# Altium PCB PCB1.PcbDoc (part 1 of 2)
Units mm, origin at the board's own origin, x right, y up, seen from the top; angles counter-clockwise.
Board outline 154.31 x 109.98 mm, 2 copper layers (Top Layer, Bottom Layer); 153 components, 126 nets, 468 pads, 76 vias.
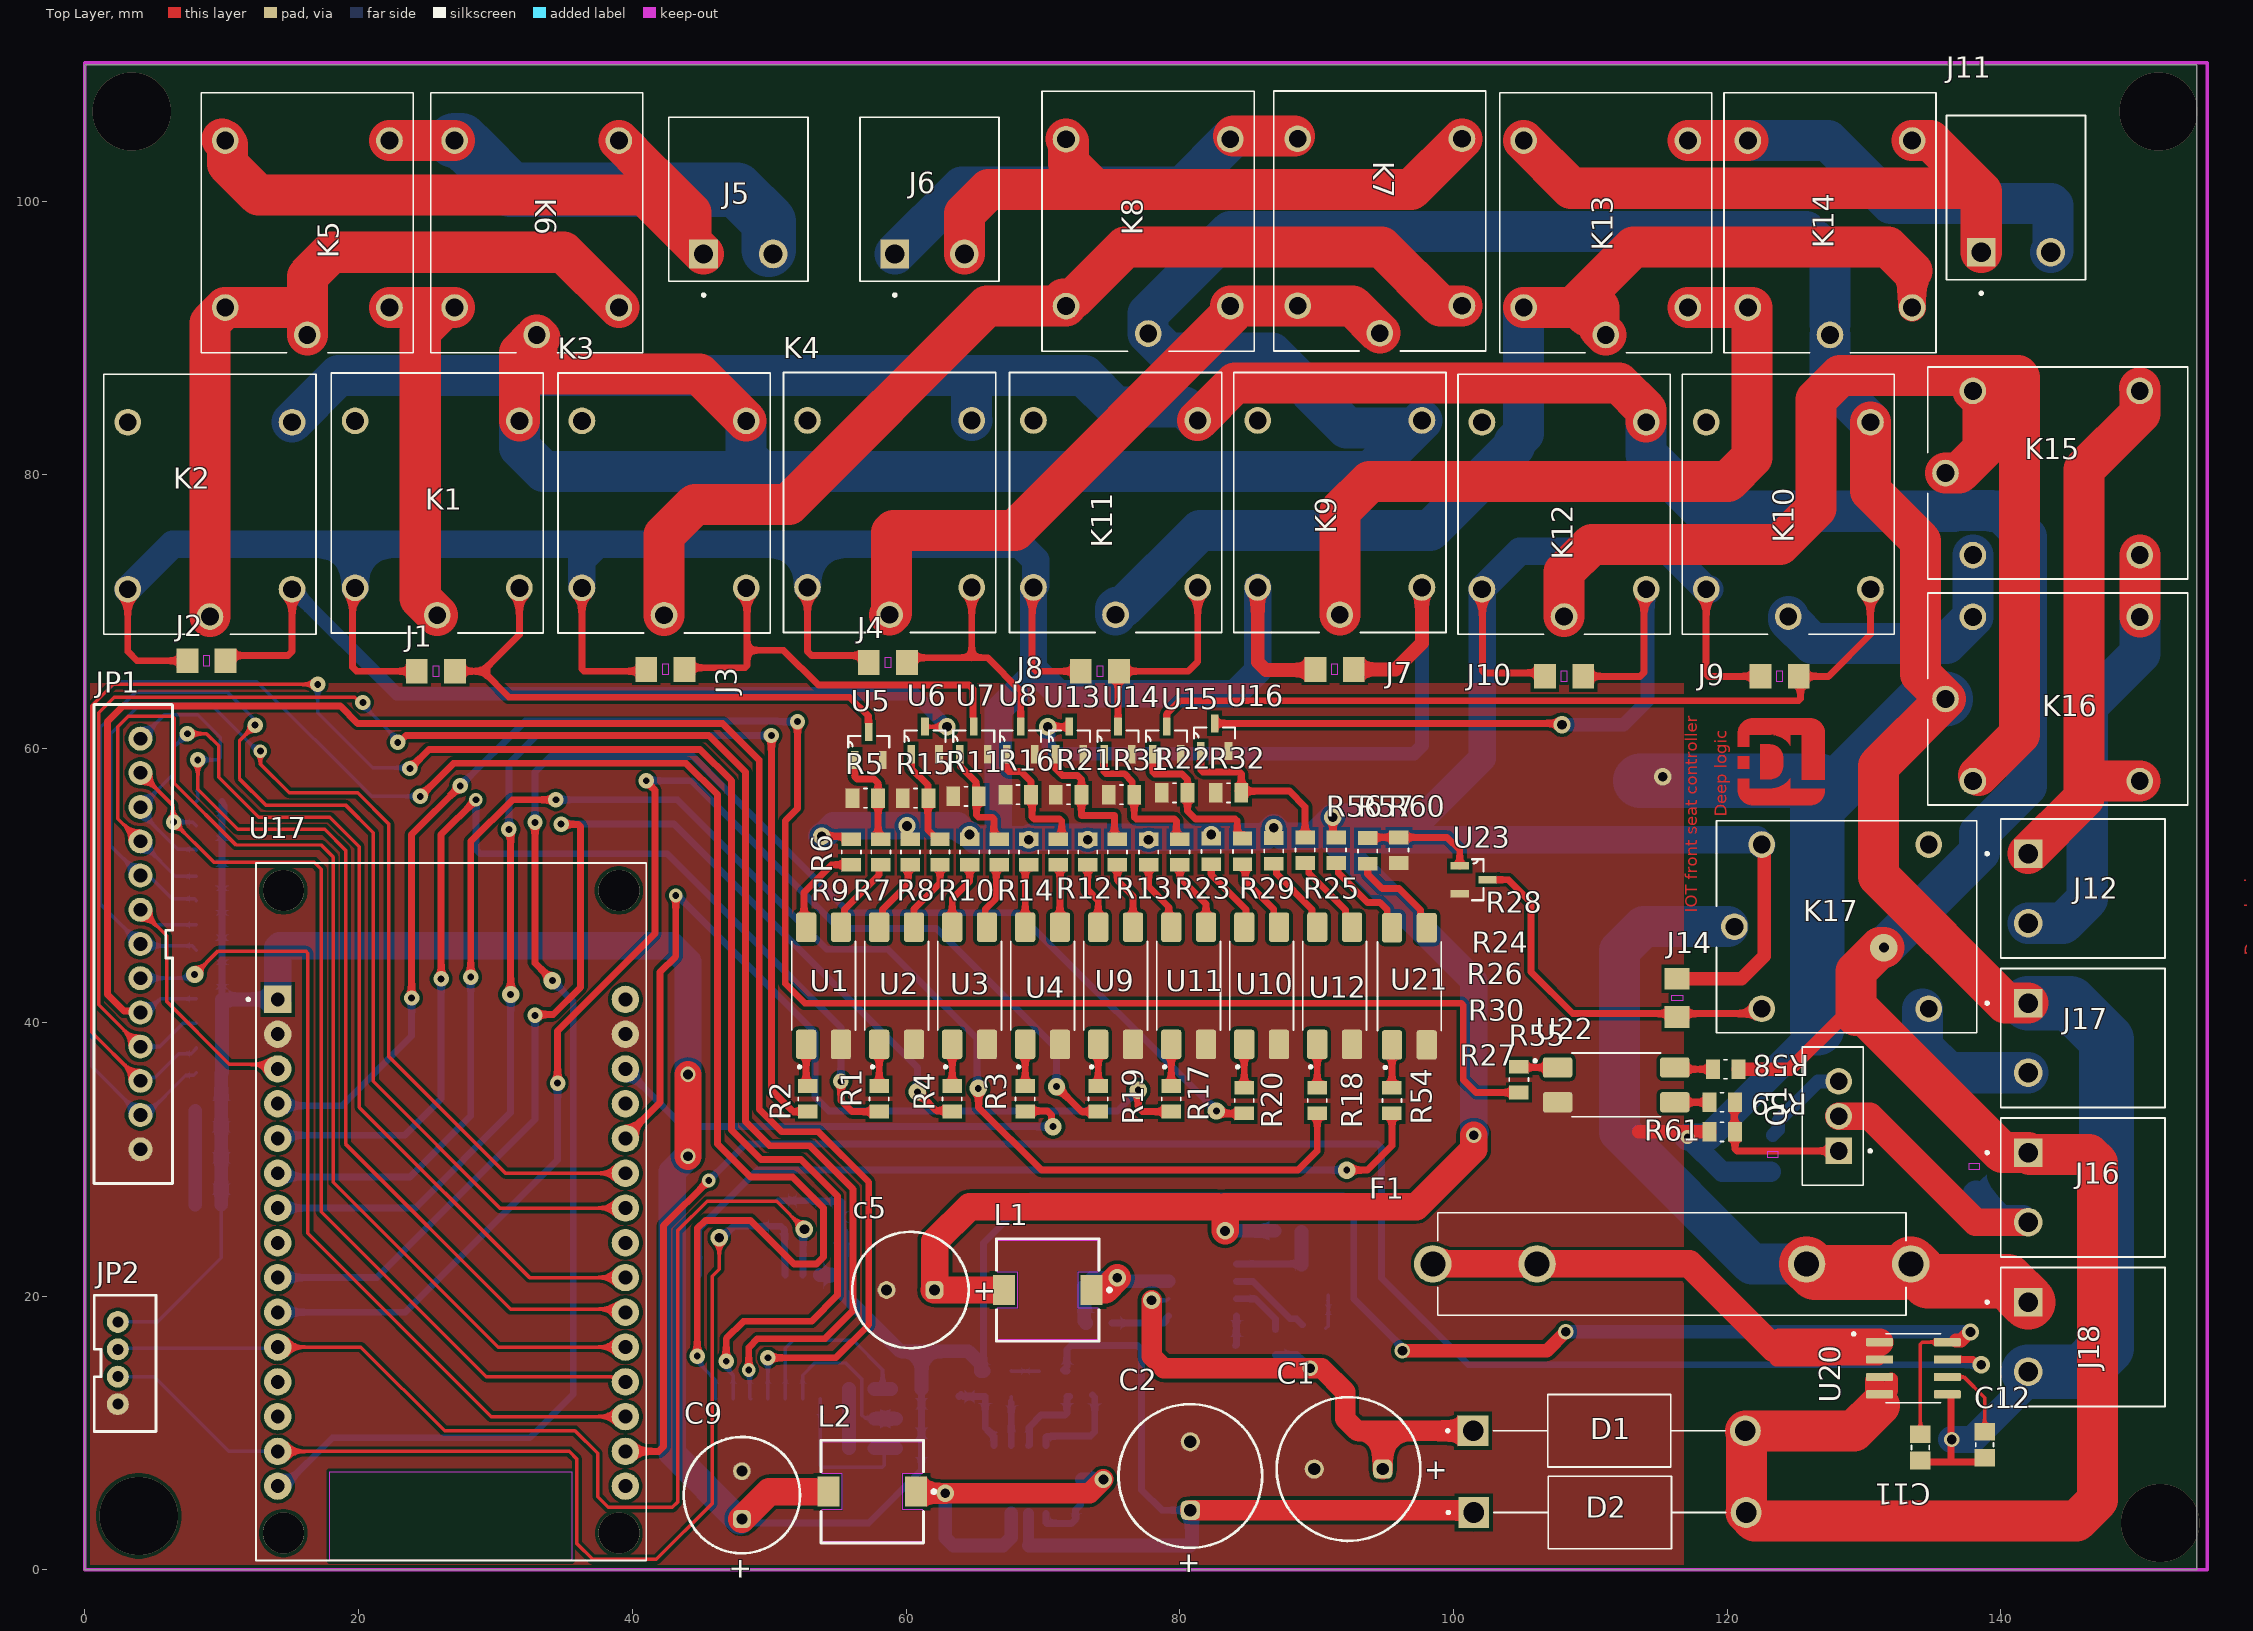
[diagram p0: Top Layer view]
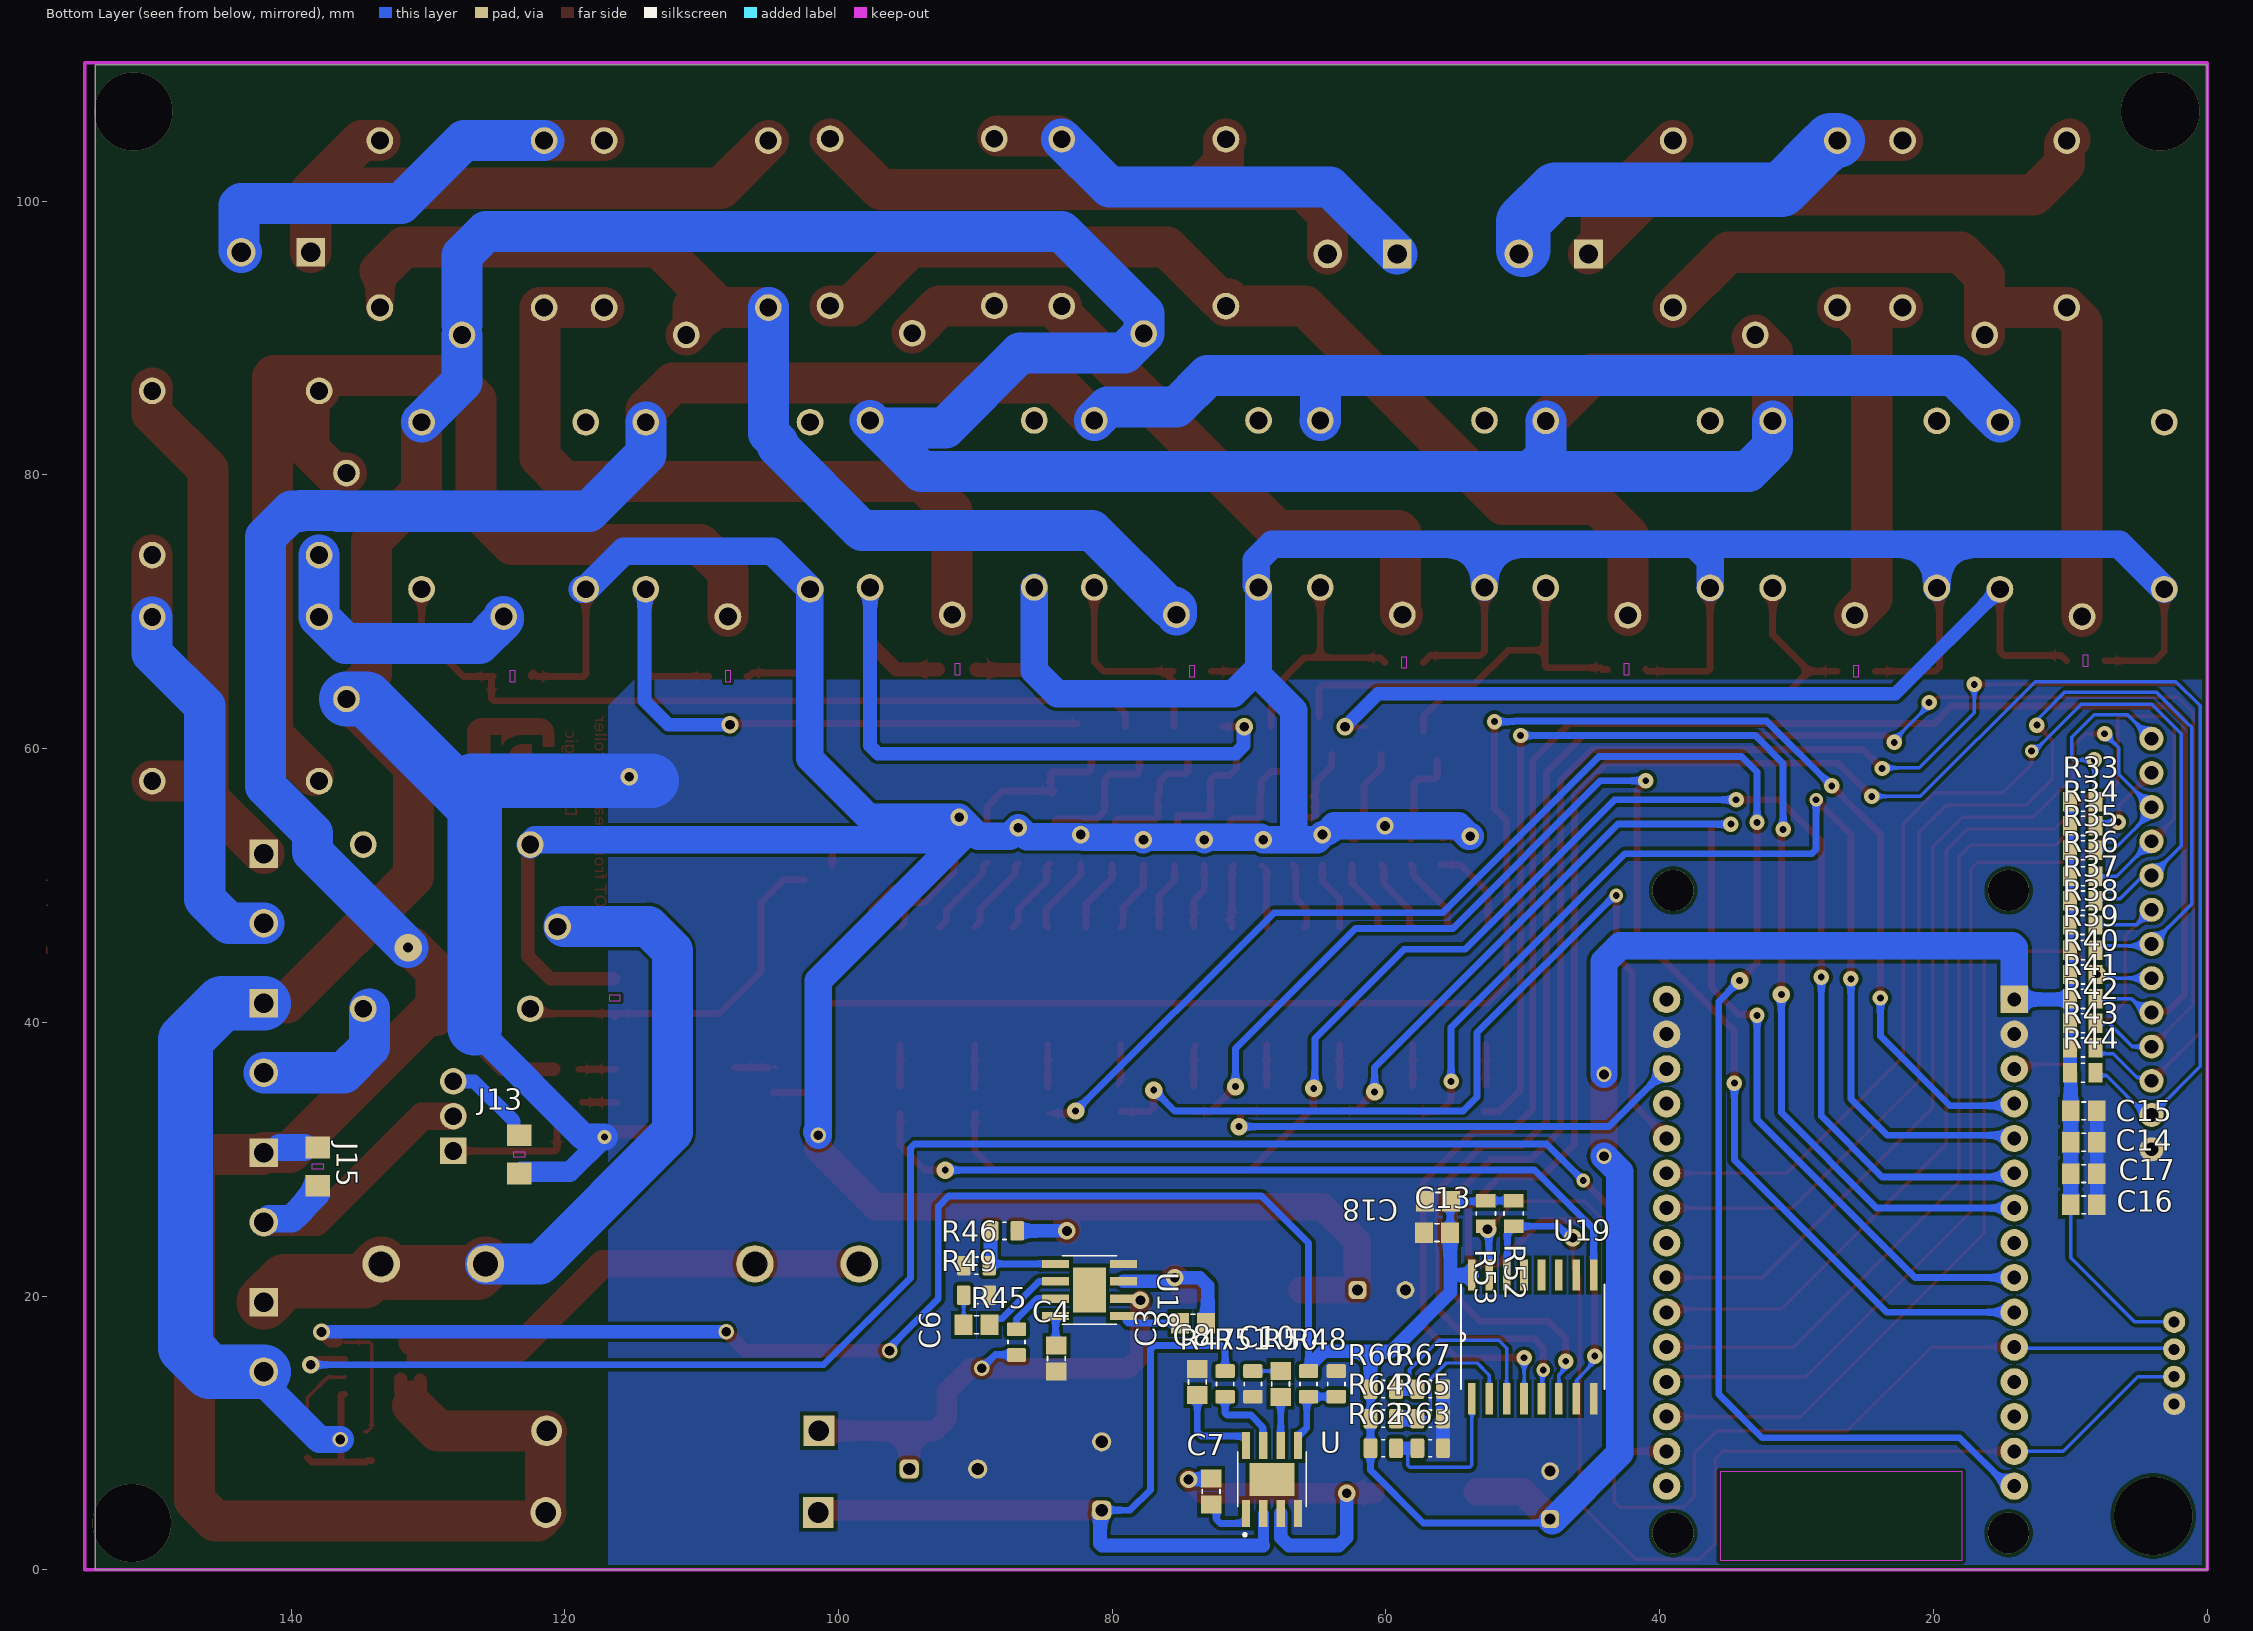
[diagram p1: Bottom Layer view, seen from below]
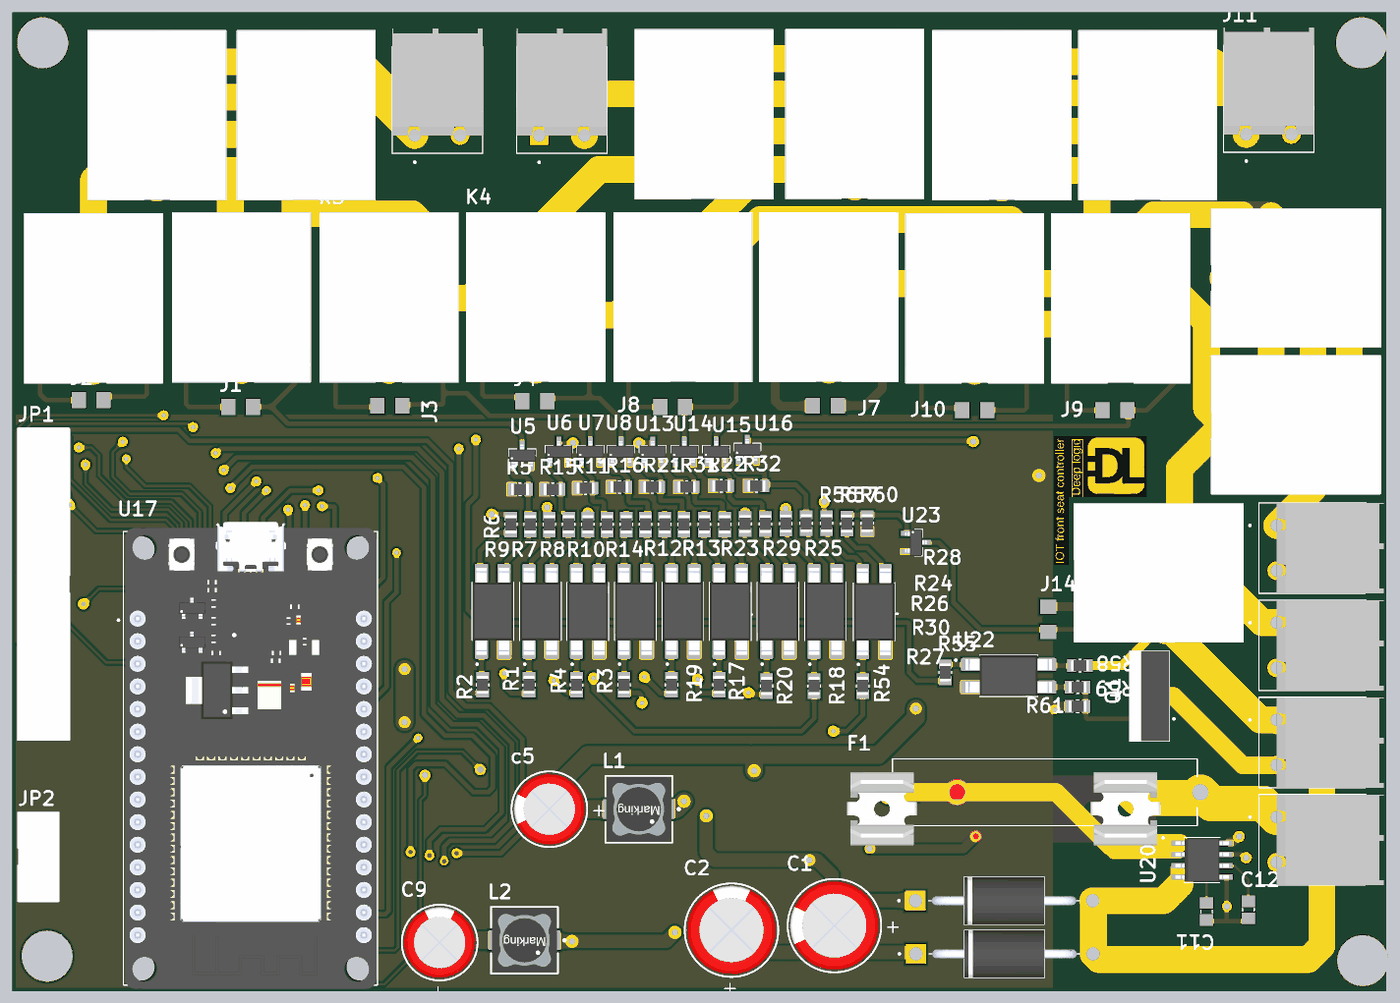
[diagram p3: 3D render of the assembled board from above, using the file's embedded part models]
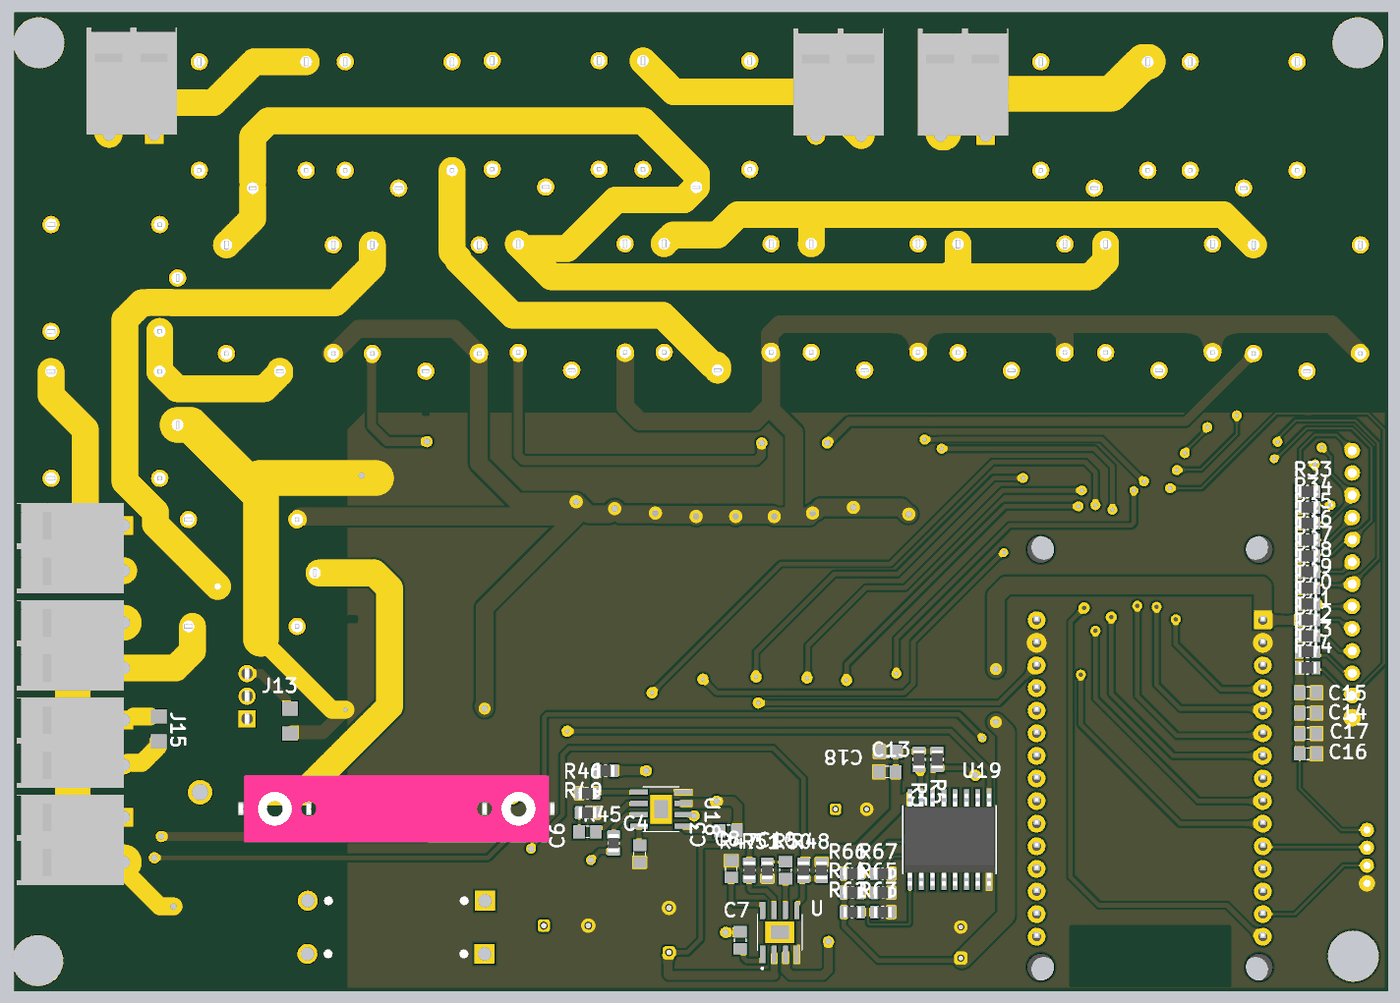
[diagram p4: 3D render of the assembled board from below, using the file's embedded part models]

## Layer stack, top to bottom
Top Solder: solder mask 0.0102, Solder Resist, Dk 3.5
Top Layer: signal copper 0.0356
Dielectric 1: dielectric 0.32, FR-4, Dk 4.8
Bottom Layer: signal copper 0.0356
Bottom Solder: solder mask 0.0102, Solder Resist, Dk 3.5

## Board outline
0,0 154.305,0 154.305,109.982 0,109.982

## Design rules (kind name [scope] priority, off if disabled: settings)
Clearance [All] p1: gap=0.254 ignorepadtopadclearanceinfootprint=FALSE except(0: Arc-Hole Track-Hole SMDPad-Hole THPad-Hole Via-Hole Fill-Hole Poly-Hole Region-Hole Text-Hole)
PolygonConnect PolygonConnect_2 [All vs IsNamedPolygon('GND_L04_P001')] p1: connectstyle=Direct reliefconductorwidth=0.254 reliefentries=4 polygonreliefangle="90 Angle" airgapwidth=0.254
PolygonConnect PolygonConnect_1 [All vs IsNamedPolygon('GND_L01_P000')] p2: connectstyle=Direct reliefconductorwidth=0.254 reliefentries=4 polygonreliefangle="90 Angle" airgapwidth=0.254
PolygonConnect [All] p3: connectstyle=Relief reliefconductorwidth=0.254 reliefentries=4 polygonreliefangle="90 Angle" airgapwidth=0.254
RoutingVias [All] p1: holewidth=0.711 width=1.27 viastyle="Through Hole" minholewidth=0.711 minwidth=1.27 maxholewidth=0.711 maxwidth=1.27
SolderMaskExpansion [All] p1: expansion=0.102 istentingtop=FALSE
Width [All] p1: maxlimit=0.254 minlimit=0.254 preferedwidth=0.254
30 further rules are at their usual default settings.

## Classes and differential pairs
component class Sheet7: J13 J14 J15 J16 J17 K17 Q1 R54 R55 R56 R57 R58 R59 R60 R61 U21 U22 U23
component class Sheet6: C11 C12 U20
component class Sheet5: C16 C17 C18 JP2 R52 R53 R62 R63 R64 R65 R66 R67 U19
component class Sheet4: C1 C2 C3 C4 c5 C6 C7 C8 C9 C10 D1 D2 F1 J18 L1 L2 R45 R46 R47 R48 R49 R50 R51
component class Sheet3: C13 C14 C15 JP1 R33 R34 R35 R36 R37 R38 R39 R40 R41 R42 R43 R44 U17
component class Sheet2: J7 J8 J9 J10 J11 J12 K9 K10 K11 K12 K13 K14 K15 K16 R17 R18 R19 R20 R21 R22 R23 R24 R25 R26 R27 R28 R29 R30 R31 R32 U9 U10 U11 U12 U13 U14 U15 U16
component class Sheet1: J1 J2 J3 J4 J5 J6 K1 K2 K3 K4 K5 K6 K7 K8 R1 R2 R3 R4 R5 R6 R7 R8 R9 R10 R11 R12 R13 R14 R15 R16 U1 U2 U3 U4 U5 U6 U7 U8

## Components (designator, comment, footprint, x,y, rotation, side; value= is the part's Value field where it differs from the comment)
C1 "1000uF" WCAP-ATG8_D10H12.5 92.329,7.366 r0 top
C2 "1000uF" WCAP-ATG8_D10H12.5 80.772,6.858 r270 top
C3 "10nf" CAPC2012X135N 74.102,18.034 r0 bottom
C4 "0.1uf" CAPC2012X135N 84.074,15.433 r270 bottom
c5 "100uf" WCAP-ATG8_D8H11.5 60.325,20.447 r0 top
C6 "3.9nf" CAPC2012X135N 89.916,17.907 r0 bottom
C7 "10nf" CAPC2012X135N 72.771,5.715 r270 bottom
C8 "0.1uf" CAPC2012X135N 73.787,13.716 r90 bottom
C9 "100uf" WCAP-ATG8_D8H11.5 48.006,5.461 r270 top
C10 "3.9nf" CAPC2012X135N 67.691,13.589 r90 bottom
C11 "0.1UF" CAPC2012X135N 134.112,8.951 r90 top
C12 "1NF" CAPC2012X135N 138.811,9.144 r270 top
C13 "0.1UF" CAPC2012X135N 56.266,24.638 r0 bottom
C14 "0.1UF" CAPC2012X135N 9.017,31.242 r180 bottom
C15 "0.1UF" CAPC2012X135N 9.017,33.528 r180 bottom
C16 "0.1UF" CAPC2012X135N 9.017,26.67 r0 bottom
C17 "0.1UF" CAPC2012X135N 9.017,28.956 r0 bottom
C18 "0.1UF" CAPC2012X135N 56.2,26.924 r180 bottom
D1 "1N5408RLG" DIOAD1990W125L900D530 111.379,10.16 r0 top
D2 "1N5408RLG" DIOAD1990W125L900D530 111.423,4.191 r0 top
F1 "4245" FUSE_4245 115.951,22.352 r180 top
J1 "1N4007SMD" C1206 25.654,65.659 r180 top
J2 "1N4007SMD" C1206 8.89,66.421 r180 top
J3 "1N4007SMD" C1206 42.418,65.786 r180 top
J4 "1N4007SMD" C1206 58.674,66.294 r180 top
J5 "282815-2" TE_282815-2 47.752,96.139 r0 top
J6 "282815-2" TE_282815-2 61.722,96.139 r0 top
J7 "1N4007SMD" C1206 91.313,65.786 r180 top
J8 "1N4007SMD" C1206 74.168,65.659 r180 top
J9 "1N4007SMD" C1206 123.825,65.278 r180 top
J10 "1N4007SMD" C1206 108.077,65.278 r180 top
J11 "282815-2" TE_282815-2 141.097,96.266 r0 top
J12 "282815-2" TE_282815-2 141.986,49.784 r270 top
J13 "1N4007SMD" C1206 123.317,30.353 r90 bottom
J14 "1N4007SMD" C1206 116.332,41.786 r90 top
J15 "1N4007SMD" C1206 138.049,29.464 r90 bottom
J16 "282815-2" TE_282815-2 141.986,27.94 r270 top
J17 "282815-2" TE_282815-2 141.986,38.862 r270 top
J18 "282815-2" TE_282815-2 141.986,17.018 r270 top
JP1 "JST_XH_13_VERT" JST-XH-13-PTH-VERT 4.064,45.727 r90 top
JP2 "JST_PH_4_VERT" JST-PH-4-PTH-VERT 2.413,15.113 r270 top
K1 "PR14-5V-360-1C" RELAY_PR14-5V-360-1C 25.75,77.947 r90 top
K2 "PR14-5V-360-1C" RELAY_PR14-5V-360-1C 9.144,77.851 r90 top
K3 "PR14-5V-360-1C" RELAY_PR14-5V-360-1C 42.322,77.947 r90 top
K4 "PR14-5V-360-1C" RELAY_PR14-5V-360-1C 58.801,77.978 r90 top
K5 "PR14-12V-360-1C" RELAY_PR14-5V-360-1C 16.256,98.425 r90 top
K6 "PR14-12V-360-1C" RELAY_PR14-5V-360-1C 33.02,98.425 r90 top
K7 "PR14-12V-360-1C" RELAY_PR14-5V-360-1C 94.615,98.552 r90 top
K8 "PR14-12V-360-1C" RELAY_PR14-5V-360-1C 77.693,98.529 r90 top
K9 "PR14-5V-360-1C" RELAY_PR14-5V-360-1C 91.694,77.978 r90 top
K10 "PR14-5V-360-1C" RELAY_PR14-5V-360-1C 124.46,77.851 r90 top
K11 "PR14-5V-360-1C" RELAY_PR14-5V-360-1C 75.311,77.978 r90 top
K12 "PR14-5V-360-1C" RELAY_PR14-5V-360-1C 108.077,77.851 r90 top
K13 "PR14-12V-360-1C" RELAY_PR14-5V-360-1C 111.125,98.425 r90 top
K14 "PR14-12V-360-1C" RELAY_PR14-5V-360-1C 127.508,98.425 r90 top
K15 "PR14-12V-360-1C" RELAY_PR14-5V-360-1C 144.145,80.137 r0 top
K16 "PR14-12V-360-1C" RELAY_PR14-5V-360-1C 144.145,63.627 r0 top
K17 "PR14-5V-360-1C" RELAY_PR14-5V-360-1C 128.723,46.99 r0 top
L1 "1 μH, 6.84 A" WE-PD_7345 70.358,20.447 r180 top
L2 "1 μH, 6.84 A" WE-PD_7345 57.531,5.715 r180 top
Q1 "TIP122G" TO254P1009X445X1985-3 128.143,33.147 r90 top
R1 "470R" RESC2012X65N#1 58.039,34.417 r90 top
R2 "470R" RESC2012X65N#1 52.832,34.417 r90 top
R3 "RN73C2A3K3BTDF" RESC2012X65N#1 68.707,34.417 r90 top
R4 "470R" RESC2012X65N#1 63.373,34.417 r90 top
R5 "1K" RESC2012X65N#1 57.023,56.388 r0 top
R6 "1K" RESC2012X65N#1 56.007,52.451 r90 top
R7 "1K" RESC2012X65N#1 60.325,52.451 r90 top
R8 "1K" RESC2012X65N#1 62.484,52.451 r90 top
R9 "1K" RESC2012X65N#1 58.166,52.451 r90 top
R10 "1K" RESC2012X65N#1 64.643,52.451 r90 top
R11 "1K" RESC2012X65N#1 64.389,56.515 r0 top
R12 "1K" RESC2012X65N#1 68.961,52.451 r90 top
R13 "1K" RESC2012X65N#1 71.12,52.451 r90 top
R14 "1K" RESC2012X65N#1 66.802,52.451 r90 top
R15 "1K" RESC2012X65N#1 60.706,56.388 r0 top
R16 "1K" RESC2012X65N#1 68.199,56.642 r0 top
R17 "470R" RESC2012X65N#1 79.375,34.417 r90 top
R18 "470R" RESC2012X65N#1 90.043,34.29 r90 top
R19 "470R" RESC2012X65N#1 74.041,34.417 r90 top
R20 "470R" RESC2012X65N#1 84.709,34.29 r90 top
R21 "1K" RESC2012X65N#1 71.882,56.642 r0 top
R22 "1K" RESC2012X65N#1 79.629,56.769 r0 top
R23 "1K" RESC2012X65N#1 73.279,52.451 r90 top
R24 "1K" RESC2012X65N#1 82.296,52.497 r90 top
R25 "1K" RESC2012X65N#1 77.724,52.451 r90 top
R26 "1K" RESC2012X65N#1 80.01,52.451 r90 top
R27 "1K" RESC2012X65N#1 86.868,52.532 r90 top
R28 "1K" RESC2012X65N#1 89.154,52.578 r90 top
R29 "1K" RESC2012X65N#1 75.438,52.451 r90 top
R30 "1K" RESC2012X65N#1 84.582,52.497 r90 top
R31 "1K" RESC2012X65N#1 75.738,56.642 r0 top
R32 "1K" RESC2012X65N#1 83.566,56.769 r0 top
R33 "10K" RESC2012X65N#1 9.09,56.134 r0 bottom
R34 "10K" RESC2012X65N#1 9.09,54.356 r0 bottom
R35 "10K" RESC2012X65N#1 9.09,52.578 r0 bottom
R36 "10K" RESC2012X65N#1 9.09,50.673 r0 bottom
R37 "10K" RESC2012X65N#1 9.09,48.895 r0 bottom
R38 "10K" RESC2012X65N#1 9.097,47.117 r0 bottom
R39 "10K" RESC2012X65N#1 9.09,45.274 r0 bottom
R40 "10K" RESC2012X65N#1 9.09,43.496 r0 bottom
R41 "10K" RESC2012X65N#1 9.09,41.718 r0 bottom
R42 "10K" RESC2012X65N#1 9.09,39.94 r0 bottom
R43 "10K" RESC2012X65N#1 9.09,38.162 r0 bottom
R44 "10K" RESC2012X65N#1 9.09,36.322 r0 bottom
R45 "100k" RESC2012X65N#2 86.995,16.637 r270 bottom
R46 "10k" RESC2012X65N#2 89.916,22.225 r180 bottom
R47 "100k" RESC2012X65N#2 71.755,13.589 r90 bottom
R48 "10k" RESC2012X65N#2 63.627,13.589 r270 bottom
R49 "6.8k" RESC2012X65N#2 89.916,20.066 r0 bottom
R50 "26.1kΩ" RESC2012X65N#2 65.659,13.589 r270 bottom
R51 "6.8k" RESC2012X65N#2 69.723,13.589 r90 bottom
R52 "1K" RESC2012X65N#1 50.673,26.035 r90 bottom
R53 "1K" RESC2012X65N#1 52.705,26.035 r90 bottom
R54 "470R" RESC2012X65N#1 95.504,34.29 r90 top
R55 "470R" RESC2012X65N#1 104.775,35.814 r90 top
R56 "1K" RESC2012X65N#1 91.44,52.578 r90 top
R57 "1K" RESC2012X65N#1 93.726,52.532 r90 top
R58 "1K" RESC2012X65N#1 119.888,36.576 r0 top
R59 "1K" RESC2012X65N#1 119.634,34.163 r0 top
R60 "1K" RESC2012X65N#1 96.012,52.578 r90 top
R61 "1K" RESC2012X65N#1 119.634,32.004 r0 top
R62 "CRG0805F33R" RESC2012X65N#2 60.198,8.89 r0 bottom
R63 "CRG0805F33R" RESC2012X65N#2 56.769,8.89 r0 bottom
R64 "CRG0805F33R" RESC2012X65N#2 60.198,11.049 r0 bottom
R65 "CRG0805F33R" RESC2012X65N#2 56.769,11.049 r0 bottom
R66 "CRG0805F33R" RESC2012X65N#2 60.198,13.208 r0 bottom
R67 "CRG0805F33R" RESC2012X65N#2 56.769,13.208 r0 bottom
U "MP2307DN-LF" SOIC127P600X170-9N 68.326,6.604 r90 bottom
U1 "PC817X2NIP1B" SOIC254P960X420-4N 53.975,42.672 r90 top
U2 "PC817X2NIP1B" SOIC254P960X420-4N 59.309,42.672 r90 top
U3 "PC817X2NIP1B" SOIC254P960X420-4N 64.643,42.672 r90 top
U4 "PC817X2NIP1B" SOIC254P960X420-4N 69.977,42.672 r90 top
U5 "BC817-40-7-F" SOT103P240X110-3N 57.277,60.198 r90 top
U6 "BC817-40-7-F" SOT103P240X110-3N 61.392,60.606 r90 top
U7 "BC817-40-7-F" SOT103P240X110-3N 64.948,60.606 r90 top
U8 "BC817-40-7-F" SOT103P240X110-3N 68.377,60.606 r90 top
U9 "PC817X2NIP1B" SOIC254P960X420-4N 75.311,42.672 r90 top
U10 "PC817X2NIP1B" SOIC254P960X420-4N 85.979,42.672 r90 top
U11 "PC817X2NIP1B" SOIC254P960X420-4N 80.645,42.672 r90 top
U12 "PC817X2NIP1B" SOIC254P960X420-4N 91.313,42.672 r90 top
U13 "BC817-40-7-F" SOT103P240X110-3N 71.933,60.606 r90 top
U14 "BC817-40-7-F" SOT103P240X110-3N 75.489,60.606 r90 top
U15 "BC817-40-7-F" SOT103P240X110-3N 79.045,60.606 r90 top
U16 "BC817-40-7-F" SOT103P240X110-3N 82.55,60.833 r90 top
U17 "ESP32-DEVKIT-V1" MODULE_ESP32_DEVKIT_V1 26.797,26.162 r0 top
U18 "MP2307DN-LF" SOIC127P600X170-9N 81.661,20.447 r0 bottom
U19 "PCF8574T/3,518" SOIC127P1032X265-16N 49.276,17.018 r90 bottom
U20 "ACS712ELCTR30AT" SOIC127P600X175-8N 133.604,14.732 r0 top
U21 "PC817X2NIP1B" SOIC254P960X420-4N 96.774,42.634 r90 top
U22 "PC817X2NIP1B" SOIC254P960X420-4N 111.887,35.433 r0 top
U23 "BC817-40-7-F" SOT103P240X110-3N 101.473,50.419 r0 top
? "44.2kΩ" RESC2012X65N#2 87.884,24.765 r0 bottom

## Footprints (in the part's own frame and the unit in brackets; to place one, negate y for a bottom-side part, rotate by r counter-clockwise, add the part's x,y. Pads: shape width x height; smd on the part's side, far side on the other; paste and mask are expansions set on the pad)
C1206 [mm]
  rect 1.6x1.8 smd: 1(-1.4,0) 2(1.4,0)
  Keep-Out Layer region: 0.2,-0.4 -0.2,-0.4 -0.2,0.4 0.2,0.4
CAPC2012X135N [mm]
  rect 1.3x1.5 smd: 1(-0.95,0) 2(0.95,0)
  silkscreen extent -0.15,-0.65 0.15,0.65
DIOAD1990W125L900D530 [mm]
  round 2.25 hole 1.5: A(9.95,0)
  rect 2.25x2.25 / inner round 2.25 / far side rect 2.25x2.25 hole 1.5: C(-9.95,0)
  silkscreen extent -11.9,-2.65 8.47,2.65, body extent -8.13,-2.65 8.13,2.65, height 5.3
FUSE_4245 [mm]
  round 2.745 hole 1.83: 1_1(-17.465,0) 1_2(-9.845,0) 2_1(9.845,0) 2_2(17.465,0)
  silkscreen extent -17.11,-3.74 17.11,3.74, body extent -13.14,-2.26 22.35,5.99, height 10.87
JST-PH-4-PTH-VERT [mil]
  round 63 hole 31.5: 1(-118.11,0) 2(-39.37,0) 3(39.37,0) 4(118.37,0)
  silkscreen extent -195,-68 197,110, body extent -195,-67 195,110, height 236
JST-XH-13-PTH-VERT [mm]
  round 1.75 hole 1: 1(-15,0) 2(-12.5,0) 3(-10,0) 4(-7.5,0) 5(-5,0) 6(-2.5,0) 7(0,0) 8(2.5,0) 9(5,0) 10(7.5,0) 11(10,0) 12(12.5,0) 13(15,0)
  silkscreen extent -17.5,-2.36 17.5,3.4, body extent -17.45,-2.38 17.45,3.37, height 7
MODULE_ESP32_DEVKIT_V1 [mm]
  rect 2x2 / inner round 2 / far side rect 2x2 hole 1.02: 1(-12.7,15.515)
  round 2 hole 1.02: 2(-12.7,12.975) 3(-12.7,10.435) 4(-12.7,7.895) 5(-12.7,5.355) 6(-12.7,2.815) 7(-12.7,0.275) 8(-12.7,-2.265) 9(-12.7,-4.805) 10(-12.7,-7.345) 11(-12.7,-9.885) 12(-12.7,-12.425) 13(-12.7,-14.965) 14(-12.7,-17.505) 15(-12.7,-20.045) 16(12.7,-20.045) 17(12.7,-17.505) 18(12.7,-14.965) 19(12.7,-12.425) 20(12.7,-9.885) 21(12.7,-7.345) 22(12.7,-4.805) 23(12.7,-2.265) 24(12.7,0.275) 25(12.7,2.815) 26(12.7,5.355) 27(12.7,7.895) 28(12.7,10.435) 29(12.7,12.975) 30(12.7,15.515)
  round 3 hole 3 unplated: ""(-12.28,-23.475) ""(-12.28,23.475) ""(12.23,-23.475) ""(12.23,23.475)
  Keep-Out Layer region: 8.78,-25.475 -8.91,-25.475 -8.91,-18.985 8.78,-18.985
  Keep-Out Layer region: 8.78,-25.475 -8.91,-25.475 -8.91,-18.985 8.78,-18.985
  silkscreen extent -14.95,-25.48 14.23,25.48, body extent -14.1,-25.9 14.1,26.55, height 7.05
RELAY_PR14-5V-360-1C [mm]
  round 1.95 hole 1.3: A1(-6.2,6) A2(-6.2,-6) COM(-8.2,0) NC(6,6) NO(6,-6)
  silkscreen extent -9.5,-7.75 9.5,7.75, body extent -9.5,-7.75 9.5,7.75, height 15.5
RESC2012X65N#1 [mm]
  rect 1x1.42 smd: 1(-0.935,0) 2(0.935,0)
  silkscreen extent -0.12,-0.7 0.12,0.7, body extent -1,-0.63 1,0.63, height 0.65
RESC2012X65N#2 [mm]
  rrect25% 1x1.42 smd: 1(-0.935,0) 2(0.935,0)
  silkscreen extent -0.12,-0.63 0.12,0.63, body extent -1,-0.63 1,0.63, height 0.65
SOIC127P600X170-9N [mm]
  rect 1.97x0.6 smd: 1(-2.475,1.905) 2(-2.475,0.635) 3(-2.475,-0.635) 4(-2.475,-1.905) 5(2.475,-1.905) 6(2.475,-0.635) 7(2.475,0.635) 8(2.475,1.905)
  rect 2.41x3.3 smd paste-3: 9(0,0)
  silkscreen extent -4.14,-2.5 2,2.5
SOIC127P600X175-8N [mm]
  rrect25% 1.97x0.6 smd: 1(-2.475,1.905) 2(-2.475,0.635) 3(-2.475,-0.635) 4(-2.475,-1.905) 5(2.475,-1.905) 6(2.475,-0.635) 7(2.475,0.635) 8(2.475,1.905)
  silkscreen extent -4.47,-2.52 2,2.6, body extent -3,-2.45 3,2.45, height 1.75
SOIC127P1032X265-16N [mil]
  rect 90x22 smd: 1(-178,175) 2(-178,125) 3(-178,75) 4(-178,25) 5(-178,-25) 6(-178,-75) 7(-178,-125) 8(-178,-175) 9(178,-175) 10(178,-125) 11(178,-75) 12(178,-25) 13(178,25) 14(178,75) 15(178,125) 16(178,175)
  silkscreen extent -150,-206 150,207, body extent -203,-203 203,203, height 104
SOIC254P960X420-4N [mm]
  rrect25% 2.15x1.48 smd: 1(-4.28,1.27) 2(-4.28,-1.27) 3(4.28,-1.27) 4(4.28,1.27)
  silkscreen extent -6.03,-2.33 3.25,2.33, body extent -4.87,-2.29 4.87,2.29, height 4
SOT103P240X110-3N [mil]
  rect 52x22 smd: 1(-40,40) 2(-40,-40) 3(40,0)
  silkscreen extent -4,-59 28,59, body extent -48,-59 48,59, height 44
TE_282815-2 [mm]
  rect 2.1x2.1 / inner round 2.1 / far side rect 2.1x2.1 hole 1.4: 1(-2.54,0)
  round 2.1 hole 1.4: 2(2.54,0)
  silkscreen extent -5.08,-3.1 5.08,10, body extent -5.08,0 5.08,12, height 4.55
TO254P1009X445X1985-3 [mm]
  rect 1.94x1.94 hole 1.29: 1(-2.54,0)
  round 1.94 hole 1.29: 2(0,0) 3(2.54,0)
  silkscreen extent -5.05,-2.4 5.05,2.66, body extent -5.05,-1.79 5.05,2.65, height 19.84
WCAP-ATG8_D8H11.5 [mm] "Aluminum Electrolytic Capacitors, 8x11.5mm"
  rrect50% 1.3x1.3 hole 0.8: 1(1.75,0)
  round 1.3 hole 0.8: 2(-1.75,0)
  silkscreen extent -4.25,-4.25 4.25,4.25, body extent -3.99,-4 4,4, height 11.81
WCAP-ATG8_D10H12.5 [mm] "Aluminum Electrolytic Capacitors, 10x12.5mm"
  rrect50% 1.4x1.4 hole 0.9: 1(2.5,0)
  round 1.4 hole 0.9: 2(-2.5,0)
  silkscreen extent -5.25,-5.25 5.25,5.25, body extent -4.99,-5 5,5, height 12.81
WE-PD_7345 [mm] "SMT Shielded Power Inductor, 2-leads, body 7.3x7.3mm"
  rect 1.6x2.2 smd: 1(-3.2,0) 2(3.2,0)
  Top Layer keep-out region: -3.65,-3.65 -3.65,-1.3 -2.2,-1.3 -2.2,1.3 -3.65,1.3 -3.65,3.65 3.65,3.65 3.65,1.3 2.2,1.3 2.2,-1.3 3.65,-1.3 3.65,-3.65
  silkscreen extent -4.63,-3.75 3.75,3.75, body extent -3.65,-3.65 3.65,3.65, height 3.91

## Part data
C1 C2: library part 860010275016, "WCAP-ATG8 Aluminum Electrolytic Capacitor, Radial, THT, D10 x H12.5mm, 1000uF, 10V", Capacitance Tolerance=+/-20%, Leakage Current=100uA, Manufacturer="Wurth Elektronik", Operating Temperature Max=85°C, Operating Temperature Min=-40°C, Rated Voltage (DC)=10V, Ripple Current=726mA, Capacitance=1000uF, Category="Aluminum Electrolytic Capacitors", ComponentLink1Description="Website Link", ComponentLink1URL=https://www.we-online.com/redexpert/article/860010275016?ad, ComponentLink2Description="Datasheet Link", ComponentLink2URL=https://www.we-online.com/redexpert/spec/860010275016?ad, Diameter=10mm, Dissipation Factor=19%, Endurance=2000h, Height=12.5mm, Manufacturer Part Number=860010275016, Match Code=WCAP-ATG8, Mount="Through Hole", Packaging="Ammo Pack", Technical Reference=ATBF125102M010DSPA9B000
C3 C4 C6 C7 C8 C10 C11 C12 C13 C14 C15 C16 C17 C18: library part GCM2165C2A151JA16D, "Cap Ceramic 150pF 100V C0G 5% Pad SMD 0805 125Â°C Automotive T/R", Package=None, Availability=Unavailable, MP=GCM2165C2A151JA16D, Price=None
c5 C9: library part 860010274012, "WCAP-ATG8 Aluminum Electrolytic Capacitor, Radial, THT, D8 x H11.5mm, 560uF, 10V", Capacitance=560uF, Capacitance Tolerance=+/-20%, Leakage Current=56uA, Manufacturer="Wurth Elektronik", Operating Temperature Max=85°C, Operating Temperature Min=-40°C, Rated Voltage (DC)=10V, Ripple Current=506mA, Category="Aluminum Electrolytic Capacitors", ComponentLink1Description="Website Link", ComponentLink1URL=https://www.we-online.com/redexpert/article/860010274012?ad, ComponentLink2Description="Datasheet Link", ComponentLink2URL=https://www.we-online.com/redexpert/spec/860010274012?ad, Diameter=8mm, Dissipation Factor=19%, Endurance=2000h, Height=11.5mm, Manufacturer Part Number=860010274012, Match Code=WCAP-ATG8, Mount="Through Hole", Packaging="Ammo Pack", Technical Reference=ATBE115561M010DSPA7B000
D1 D2: "Diodo estÃ¡ndar 1000 V 3 A orificio pasante DO-201AD", Package="AXIAL LEAD-2 ON Semiconductor", Check_prices=https://www.snapeda.com/parts/1N5408RLG/Onsemi/view-part/?ref=eda, MF="ON Semiconductor", MP=1N5408RLG, SnapEDA_Link=https://www.snapeda.com/parts/1N5408RLG/Onsemi/view-part/?ref=snap
F1: "Fuse Holder, THM, Press-Fit, 1 Fuse, Fuse Size 3AG, 15 A, PBT/Brass-Tin", Package=None, Check_prices=https://www.snapeda.com/parts/4245/Keystone/view-part/?ref=eda, MF="Keystone Electronics", MP=4245, SnapEDA_Link=https://www.snapeda.com/parts/4245/Keystone/view-part/?ref=snap
J1 J2 J3 J4 J7 J8 J9 J10 J13 J14 J15: "RECTIFIER, 1KV, 1A, DO-214AC; Available until stocks are exhausted Alternatives available", Package=None, Availability="Not in stock", Check_prices=https://www.snapeda.com/parts/1N4007SMD/Multicomp/view-part/?ref=eda, MF="Multicomp Pro", MP=1N4007SMD, Price=None, SnapEDA_Link=https://www.snapeda.com/parts/1N4007SMD/Multicomp/view-part/?ref=snap
J5 J6 J11 J12 J16 J17 J18: "2 Position Terminal Block Header, Male Pins, Shrouded (2 Side) 0.200 (5.08mm) 90Â°, Right Angle - Through Hole", Package=None, Check_prices=https://www.snapeda.com/parts/282815-2/TE+Connectivity+AMP+Connectors/view-part/?ref=eda, EU_RoHS_Compliance="Compliant with Exemptions", MF="TE Connectivity", MP=282815-2, SnapEDA_Link=https://www.snapeda.com/parts/282815-2/TE+Connectivity+AMP+Connectors/view-part/?ref=snap
JP1: Manufacturer="JST Sales America, Inc.", PartNumber=B13B-XH-A(LF)(SN), Mounting Technology="Through Hole", PackageReference=JST-XH
JP2: Manufacturer="JST Sales America Inc.", PartNumber=B4B-PH-K-S(LF)(SN), Mounting Technology="Through Hole", PackageReference=JST-PH
K1 K2 K3 K4 K9 K10 K11 K12 K17: "19 x 15.5 x 15.8 mm, 5 V, 10 A, SPDT (1 Form C), Power Relay", Package=None, Check_prices=https://www.snapeda.com/parts/PR14-5V-360-1C/Same+Sky/view-part/?ref=eda, MF="Same Sky", MP=PR14-5V-360-1C, SnapEDA_Link=https://www.snapeda.com/parts/PR14-5V-360-1C/Same+Sky/view-part/?ref=snap
K5 K6 K7 K8 K13 K14 K15 K16: library part PR14-5V-360-1C, "19 x 15.5 x 15.8 mm, 5 V, 10 A, SPDT (1 Form C), Power Relay", Package=None, Check_prices=https://www.snapeda.com/parts/PR14-5V-360-1C/Same+Sky/view-part/?ref=eda, MF="Same Sky", MP=PR14-5V-360-1C, SnapEDA_Link=https://www.snapeda.com/parts/PR14-5V-360-1C/Same+Sky/view-part/?ref=snap
L1 L2: library part 744777001, "WE-PD SMT Power Inductor, size 7345, 1 μH, 6.84 A, 10 mΩ", Case/Size Code=7345, DC Resistance="8.4 mΩ", DC Resistance Max="10 mΩ", Inductance="1 μH", Manufacturer="Wurth Elektronik", Max Operating Temperature="125 °C", Min Operating Temperature="-40 °C", Rated Current="6.84 A", Saturation Current="10.2 A", Self Resonant Frequency="100 MHz", Category="Power Inductors", ComponentLink1Description="Website Link", ComponentLink1URL=https://www.we-online.com/redexpert/article/744777001?ad, ComponentLink2Description="Datasheet Link", ComponentLink2URL=https://www.we-online.com/redexpert/spec/744777001?ad, Height="4.5 mm", Length="7.3 mm", Manufacturer Part Number=744777001, Match Code=WE-PD, Mount="Surface Mount", Packaging="Tape and Reel", Type=Standard, Width="7.3 mm"
Q1: "Bipolar (BJT) Transistor NPN - Darlington 100V 5A 2W Through Hole TO-220AB", Package=None, Availability=Good, Check_prices=https://www.snapeda.com/parts/TIP122G/ON%20Semiconductor/view-part/385313/?ref=eda, MF="ON Semiconductor", MP=TIP122G, Price=None, Purchase-URL=https://pricing.snapeda.com/search/part/TIP122G/?ref=eda, SnapEDA_Link=https://www.snapeda.com/parts/TIP122G/ON%20Semiconductor/view-part/385313/?ref=snap
R1 R2 R4 R5 R6 R7 R8 R9 R10 R11 R12 R13 R14 R15 R16 R17 R18 R19 R20 R21 R22 R23 R24 R25 R26 R27 R28 R29 R30 R31 R32 R33 R34 R35 R36 R37 R38 R39 R40 R41 R42 R43 R44 R52 R53 R54 R55 R56 R57 R58 R59 R60 R61: library part RN73C2A3K3BTDF, "TE; IND Devices; Resistors; RN 0805 3K3 0.1% 10PPM 1K RL", Package=0805, Power_Rating=".1 W", Resistance=3.3K, Tolerance=.1%, Voltage_Rating="100 V", Check_prices=https://www.snapeda.com/parts/RN73C2A3K3BTDF/TE+Connectivity/view-part/?ref=eda, EU_RoHS_Compliance=Compliant, MF="TE Connectivity", MP=RN73C2A3K3BTDF, SnapEDA_Link=https://www.snapeda.com/parts/RN73C2A3K3BTDF/TE+Connectivity/view-part/?ref=snap
R3: "TE; IND Devices; Resistors; RN 0805 3K3 0.1% 10PPM 1K RL", Package=0805, Power_Rating=".1 W", Resistance=3.3K, Tolerance=.1%, Voltage_Rating="100 V", Check_prices=https://www.snapeda.com/parts/RN73C2A3K3BTDF/TE+Connectivity/view-part/?ref=eda, EU_RoHS_Compliance=Compliant, MF="TE Connectivity", MP=RN73C2A3K3BTDF, SnapEDA_Link=https://www.snapeda.com/parts/RN73C2A3K3BTDF/TE+Connectivity/view-part/?ref=snap
R45 R46 R47 R48 R49 R50 R51 ?: library part CRG0805F33R, "Fixed Resistors", Package=0805, Availability="In Stock", Check_prices=https://www.snapeda.com/parts/CRG0805F33R/TE+Connectivity+Passive+Product/view-part/?ref=eda, EU_RoHS_Compliance="Compliant with Exemptions", MF="TE Connectivity", MP=CRG0805F33R, Price=None, Purchase-URL=https://pricing.snapeda.com/search/part/CRG0805F33R/?ref=eda, SnapEDA_Link=https://www.snapeda.com/parts/CRG0805F33R/TE+Connectivity+Passive+Product/view-part/?ref=snap
R62 R63 R64 R65 R66 R67: "Fixed Resistors", Package=0805, Availability="In Stock", Check_prices=https://www.snapeda.com/parts/CRG0805F33R/TE+Connectivity+Passive+Product/view-part/?ref=eda, EU_RoHS_Compliance="Compliant with Exemptions", MF="TE Connectivity", MP=CRG0805F33R, Price=None, Purchase-URL=https://pricing.snapeda.com/search/part/CRG0805F33R/?ref=eda, SnapEDA_Link=https://www.snapeda.com/parts/CRG0805F33R/TE+Connectivity+Passive+Product/view-part/?ref=snap
U U18: "Buck Switching Regulator IC Positive Adjustable 0.925V 1 Output 3A 8-SOIC _0.154, 3.90mm Width_ Exposed Pad", Package="SOIC-8 Monolithic Power Systems", Availability=Unavailable, MF="Monolithic Power", MP=MP2307DN-LF, Price=None, SnapEDA_Link=https://www.snapeda.com/parts/MP2307DN-LF/Monolithic%20Power%20Systems%20Inc./view-part/424671/?ref=snap
U1 U2 U3 U4 U9 U10 U11 U12 U21 U22: "Optocoupler DC-IN 1-CH Transistor DC-OUT 4-Pin DIP SMD T/R", Package="SMD-4 Sharp Microelectronics", Check_prices=https://www.snapeda.com/parts/PC817X2NIP1B/Sharp+Microelectronics/view-part/?ref=eda, MF="Sharp Microelectronics", MP=PC817X2NIP1B, SnapEDA_Link=https://www.snapeda.com/parts/PC817X2NIP1B/Sharp+Microelectronics/view-part/?ref=snap
U5 U6 U7 U8 U13 U14 U15 U16 U23: "Bipolar (BJT) Transistor NPN 45 V 500 mA 100MHz 310 mW Surface Mount SOT-23-3", Package="SOT-23 Diodes Inc.", Availability="In Stock", Check_prices=https://www.snapeda.com/parts/BC817-40-7-F/Diodes+Inc./view-part/?ref=eda, MF="Diodes Inc.", MP=BC817-40-7-F, Price=None, Purchase-URL=https://pricing.snapeda.com/search/part/BC817-40-7-F/?ref=eda, SnapEDA_Link=https://www.snapeda.com/parts/BC817-40-7-F/Diodes+Inc./view-part/?ref=snap
U17: "Dual core, Wi-Fi: 2.4 GHz up to 150 Mbits/s,BLE (Bluetooth Low Energy) and legacy Bluetooth, 32 bits, Up to 240 MHz", Package=None, Check_prices=https://www.snapeda.com/parts/ESP32-DEVKIT-V1/Do+it/view-part/?ref=eda, MF="Do it", MP=ESP32-DEVKIT-V1, SnapEDA_Link=https://www.snapeda.com/parts/ESP32-DEVKIT-V1/Do+it/view-part/?ref=snap
U19: "I/O Expander 8 IÂ²C 100 kHz 16-SO", Package="SOIC-16 NXP Semiconductors", Availability="In Stock", Check_prices=https://www.snapeda.com/parts/PCF8574T/3,518/NXP+USA+Inc./view-part/?ref=eda, MF="NXP USA", MP=PCF8574T/3,518, Price=None, Purchase-URL=https://pricing.snapeda.com/search/part/PCF8574T/3,518/?ref=eda, SnapEDA_Link=https://www.snapeda.com/parts/PCF8574T/3,518/NXP+USA+Inc./view-part/?ref=snap
U20: "Current Sensor 30A 1 Channel Hall Effect, Open Loop Bidirectional 8-SOIC (0.154, 3.90mm Width)", Package="SOIC-8 Allegro", Check_prices=https://www.snapeda.com/parts/ACS712ELCTR30AT/Allegro/view-part/?ref=eda, MF="Allegro MicroSystems LLC", MP=ACS712ELCTR30AT, SnapEDA_Link=https://www.snapeda.com/parts/ACS712ELCTR30AT/Allegro/view-part/?ref=snap

## Via types
v1: diameter 1.127, hole 0.5, Top Layer to Bottom Layer, 26 vias
v2: diameter 1.27, hole 0.711, Top Layer to Bottom Layer, 22 vias
v3: diameter 1.27, hole 0.5, Top Layer to Bottom Layer, 10 vias
v4: diameter 1.127, hole 0.711, Top Layer to Bottom Layer, 7 vias
v5: diameter 1, hole 0.5, Top Layer to Bottom Layer, 6 vias
v6: diameter 5.711, hole 5.711, Top Layer to Bottom Layer, 4 vias
v7: diameter 2, hole 0.711, Top Layer to Bottom Layer, 1 vias

## Nets (pads, with @x,y where several pads share a name; then routed paths per layer and width w, separated by ;. In a path a pad name is that pad's centre, name@x,y a point inside that pad or via, vN(x,y) a via of type N, cw(c..) or ccw(c..) an arc to the next point about the centre after c; other vN are vias at no path point)
3V3: C9.1 C11.2 C13.1 C14.1 C15.1 C16.2 C17.2 C18.2 JP2.1 L2.2 R33.2 R34.2 R35.2 R36.2 R37.2 R38.2 R39.2 R40.2 R41.2 R42.2 R43.2 R44.2 R50.1 R52.2 R53.2 R62.2 R64.2 R66.2 U17.1 U19.16 U20.8 | length 283.9
  Top Layer w0.254: C11.2@134.62,10.094 134.442,10.094 134.112,10.424 134.112,16.488 134.261,16.637 U20.8@136.079,16.637
  Top Layer w1: v4(96.266,16.002) 106.807,16.002 v4(108.204,17.399) ; U20.8@136.705,16.764 137.087,16.764 137.702,17.379 v2(137.775,17.379)
  Top Layer w2: v4(44.069,30.226) v4(44.069,36.195) ; C9.1@48.006,3.711 50.01,5.715 53.331,5.715
  Bottom Layer w0.254: JP2.1@2.413,18.113 5.286,18.113 9.967,22.794 C16.2@9.967,26.67 ; R44.2@9.967,36.264 R44.2@10.025,36.322 ; R33.2@10.025,56.134 10.287,55.872 10.287,55.245 ; 14.097,45.444 14.246,45.593 ; 16.256,45.593 16.383,45.466 ; R53.2@52.705,26.97 53.167,26.97 R53.2@53.213,26.924 ; 55.167,21.539 55.316,21.688 ; C18.2@55.25,26.924 C18.2@55.316,26.858 ; v4(108.204,17.399) v4@108.214,17.389 ; v2@137.765,17.389 v2(137.775,17.379)
  Bottom Layer w0.5: R41.2@10.025,41.718 R40.2@10.025,43.496 R39.2@10.025,45.274 10.029,45.278 R38.2@10.029,47.113 ; R38.2@10.025,47.117 R37.2@10.025,48.895 R36.2@10.025,50.673 R35.2@10.025,52.578 R34.2@10.025,54.356 R33.2@10.025,56.134 ; C9.1@48.006,3.711 48.288,3.429 57.277,3.429 61.133,7.285 R62.2@61.133,8.89 R64.2@61.133,11.049 61.133,13.143 61.198,13.208 R66.2@61.133,13.208 ; R52.2@50.673,26.97 R53.2@52.705,26.97 ; R53.2@53.213,26.924 C18.2@55.25,26.924 ; C13.1@55.316,24.638 C18.2@55.316,26.858 ; 61.133,15.963 61.299,16.129 ; R50.1@65.659,14.524 65.659,23.876 69.088,27.305 91.948,27.305 92.71,26.543 92.71,19.812 v4@96.337,16.185
  Bottom Layer w1: C16.2@9.967,26.67 C17.2@9.967,28.956 C14.1@9.967,31.242 C15.1@9.967,33.528 R44.2@9.967,36.264 ; R44.2@10.025,36.322 R43.2@10.025,38.162 R42.2@10.025,39.94 10.025,41.677 U17.1@14.097,41.677 ; U19.16@53.721,21.539 55.167,21.539 ; C13.1@55.316,24.638 55.316,21.688 55.316,20.249 59.602,15.963 61.133,15.963 ; R66.2@61.133,13.208 61.133,15.963 ; R50.1@65.659,14.524 65.449,14.524 65.449,15.069 64.555,15.963 61.133,15.963 ; v4@108.214,17.389 v2@137.765,17.389
  Bottom Layer w2: U17.1@14.097,41.677 14.097,45.444 ; 14.246,45.593 16.256,45.593 42.897,45.593 44.069,44.421 v4(44.069,36.195) ; v4(44.069,30.226) 42.926,29.083 42.926,8.509 C9.1@47.865,3.57
+5: ?.1 c5.1 J1.2 J2.2 J3.2 J4.2 J7.2 J8.2 J9.2 J10.2 J14.2 K1.A1 K2.A1 K3.A1 K4.A1 K9.A1 K10.A1 K11.A1 K12.A1 K17.A1 L1.2 R6.2 R7.2 R10.2 R12.2 R23.2 R24.2 R25.2 R27.2 R56.2 | length 421.1
  Top Layer w0.254: R6.2@55.499,53.594 55.707,53.386 R6.2@56.007,53.386 ; R56.2@91.186,53.767 R56.2@91.44,53.513 ; 91.186,54.356 91.313,54.483 91.186,54.61 v2(91.186,54.991)
  Top Layer w0.5: K2.A1@3.144,71.651 3.144,67.087 3.81,66.421 J2.2@7.49,66.421 ; K1.A1@19.75,71.747 19.558,71.555 19.558,65.952 19.851,65.659 J1.2@24.254,65.659 ; K3.A1@36.322,71.747 36.322,65.808 36.471,65.659 40.891,65.659 J3.2@41.018,65.786 ; K4.A1@52.801,71.778 52.801,67.095 53.094,66.802 56.766,66.802 J4.2@57.274,66.294 ; v2(53.848,53.594) R6.2@55.499,53.594 ; K11.A1@69.311,71.778 69.192,71.778 69.215,71.755 69.215,65.952 69.508,65.659 J8.2@72.768,65.659 ; R56.2@91.186,53.767 91.186,54.356 ; K12.A1@102.077,71.651 102.108,71.62 102.108,65.681 102.257,65.532 106.299,65.532 106.553,65.278 J10.2@106.677,65.278 ; K10.A1@118.46,71.651 118.46,65.436 118.618,65.278 122.047,65.278 122.301,65.532 122.425,65.408 J9.2@122.425,65.278
  Top Layer w1: K9.A1@85.694,71.778 85.694,66.331 86.28,65.745 89.872,65.745 J7.2@89.913,65.786 ; J14.2@116.432,43.186 121.037,43.186 122.705,44.854 122.705,52.808 K17.A1@122.523,52.99
  Top Layer w2: c5.1@62.075,20.447 66.158,20.447 ; c5.1@62.103,20.701 62.103,24.003 64.643,26.543 82.726,26.543 83.312,25.957 ; v2(83.312,24.765) 83.312,25.957 ; v4(101.473,31.75) 101.473,30.734 97.282,26.543 83.312,26.543 83.312,25.957
  Bottom Layer w1: v2(83.312,24.765) ?.1@86.949,24.765
  Bottom Layer w2: K2.A1@3.144,71.651 6.423,74.93 19.75,74.93 ; K1.A1@19.75,71.747 19.75,74.93 ; K3.A1@36.322,71.747 36.322,73.758 37.494,74.93 52.801,74.93 ; 38.227,74.93 19.75,74.93 ; K4.A1@52.801,71.778 52.801,74.93 ; v2(53.848,53.594) 53.944,53.594 54.706,54.356 v2(60.071,54.356) 63.785,54.356 v2@64.2,53.941 ; v2(64.643,53.721) 65.024,53.34 66.728,53.34 v2(68.961,53.34) 69.142,53.521 73.098,53.521 v2(73.279,53.34) 73.46,53.521 77.543,53.521 v2(77.724,53.34) 77.897,53.513 v2@82.088,53.513 ; 66.728,54.304 66.728,62.791 69.311,65.374 K11.A1@69.311,71.778 69.469,71.936 69.469,73.758 68.297,74.93 52.801,74.93 ; 69.469,65.688 71.152,64.005 84.011,64.005 85.694,65.688 K9.A1@85.694,71.778 ; v2@82.45,53.567 86.218,53.567 v2(86.868,54.217) 87.491,53.594 89.789,53.594 v2(91.186,54.991) 97.79,54.991 102.108,59.309 102.108,71.62 K12.A1@102.077,71.651 104.848,74.422 115.689,74.422 K10.A1@118.46,71.651 K10.A1@118.722,71.651 ; v2@91.186,54.84 91.186,53.34 ; v4(101.473,31.75) 101.473,31.877 101.6,32.004 101.473,32.131 101.473,43.053 91.186,53.34 ; K17.A1@122.523,52.99 122.173,53.34 91.186,53.34
  other v2: 82.296,53.721
ADCin: U17.17 U20.7 | length 132.7
  Top Layer w0.5: U17.17@39.497,8.657 41.931,8.657 42.291,9.017 42.291,25.146 v5(45.593,28.448) ; U20.7@136.079,15.367 137.968,15.367 138.349,14.986 v2(138.557,14.986)
  Bottom Layer w0.5: v5(45.593,28.448) 48.26,31.115 94.449,31.115 94.742,30.822 94.742,21.336 101.092,14.986 v2(138.557,14.986)
button1_pcf: JP1.5 R41.1 U19.4 | length 134.7
  Top Layer w0.5: JP1.5@4.064,40.727 3.966,40.825 2.863,40.825 1.651,42.037 1.651,61.976 2.794,63.119 18.669,63.119 19.939,61.849 46.609,61.849 49.276,59.182 49.276,33.655 50.927,32.004 53.594,32.004 57.277,28.321 57.277,17.907 54.864,15.494 v1(49.911,15.494)
  Bottom Layer w0.254: JP1.5@4.064,40.727 4.532,40.727 4.572,40.767 4.572,40.83 4.755,41.013 4.818,41.013 5.523,41.718 R41.1@8.155,41.718 ; U19.4@49.911,12.497 v1(49.911,15.494)
button2_pcf: JP1.4 R42.1 U19.5 | length 138.5
  Top Layer w0.254: JP1.4@4.064,38.227 3.937,38.1 3.937,38.227 3.937,38.354 1.016,41.275 1.016,62.611 2.159,63.754 19.735,63.754 20.116,63.373 v1(20.32,63.373)
  Top Layer w0.5: v1(22.86,60.452) 22.958,60.452 23.466,60.96 45.593,60.96 48.26,58.293 48.26,32.766 50.038,30.988 52.959,30.988 56.134,27.813 56.134,18.948 54.077,16.891 49.149,16.891 48.514,16.256 v5(48.514,14.605)
  Bottom Layer w0.254: JP1.4@4.064,38.227 4.064,38.481 4.318,38.227 5.461,38.227 7.174,39.94 R42.1@8.155,39.94 ; v1(20.32,63.373) 20.487,63.206 20.487,63.015 22.86,60.643 v1(22.86,60.452) ; v5(48.514,14.605) 48.578,14.541 48.578,12.56 U19.5@48.641,12.497
button3_pcf: JP1.3 R43.1 U19.6 | length 142.4
  Top Layer w0.254: JP1.3@4.064,35.727 4.064,36.068 3.937,36.195 3.596,36.195 0.508,39.283 0.508,63.119 2.088,64.699 v1(17.018,64.699)
  Top Layer w0.5: v1(23.749,58.547) 25.146,59.944 44.958,59.944 47.244,57.658 47.244,32.131 49.403,29.972 52.324,29.972 54.991,27.305 54.991,20.066 53.086,18.161 48.133,18.161 46.863,16.891 v1(46.863,15.24)
  Bottom Layer w0.254: JP1.3@4.586,35.8 4.746,35.96 5.099,35.96 6.858,37.719 7.782,37.719 8.155,38.092 R43.1@8.155,38.162 ; v1(17.018,64.699) 17.018,62.611 21.026,58.603 23.693,58.603 v1(23.749,58.547) ; v1@46.863,14.732 47.371,14.224 U19.6@47.371,12.497
button4_pcf: JP1.2 R44.1 U19.7 | length 152.1
  Top Layer w0.254: JP1.2@3.683,33.02 3.89,33.227 JP1.2@4.064,33.227
  Top Layer w0.5: v1(24.511,56.515) 26.924,58.928 43.942,58.928 46.228,56.642 46.228,31.115 48.641,28.702 51.723,28.702 53.975,26.45 53.975,22.86 53.467,22.352 51.816,22.352 48.641,25.527 45.339,25.527 44.744,24.932 v1(44.744,15.621)
  Bottom Layer w0.254: R44.1@8.155,36.322 7.958,36.125 7.367,36.125 4.469,33.227 JP1.2@4.064,33.227 4.064,33.528 3.763,33.528 0.508,36.783 0.508,63.119 2.286,64.897 8.64,64.897 8.659,64.878 9.375,64.878 9.394,64.897 12.573,64.897 20.955,56.515 v1(24.511,56.515) ; v1(44.744,15.621) 44.744,15.232 45.291,14.684 45.291,14.653 46.072,13.872 46.072,12.526 U19.7@46.101,12.497
GND: C1.2 C2.2 C4.2 c5.2 C8.2 C9.2 C11.1 C12.2 C13.2 C14.2 C15.2 C16.1 C17.1 C18.1 J13.1 J17.1 J18.2 JP1.1 JP2.4 K1.NO K3.NO K6.COM K8.COM K9.NO K10.NO K14.COM K16.COM R5.1 R11.1 R15.1 R16.1 R21.1 R22.1 R31.1 R32.1 R46.1 R48.1 R49.1 R51.1 R60.1 R61.1 R63.1 R65.1 R67.1 U1.2 U2.2 U3.2 U4.2 U5.2 U6.2 U7.2 U8.2 U9.2 U10.2 U11.2 U12.2 U13.2 U14.2 U15.2 U16.2 U17.2 U17.29 U18.4 U19.8 U20.5 U21.2 U22.2 U23.2 U.4 | length 377.7
  Top Layer w0.254: K8.COM@77.597,90.805 77.693,90.709 K8.COM@77.693,90.329
  Top Layer w0.5: C11.1@134.112,8.001 134.366,8.001 134.493,7.874 136.352,7.874 ; U20.5@136.079,12.827 136.302,12.827 136.352,12.777 136.352,7.874 ; C12.2@138.811,8.194 138.491,7.874 136.352,7.874
  Top Layer w1: 113.538,32.004 R61.1@118.699,32.004
  Top Layer w3: K1.NO@31.75,83.947 31.75,88.928 K6.COM@32.766,89.944 ; K6.COM@33.244,90.001 K6.COM@33.02,90.225 33.02,87.376 44.893,87.376 K3.NO@48.322,83.947 ; K10.NO@130.46,83.851 130.46,78.836 134.112,75.184 134.112,65.46 K16.COM@135.945,63.627 131.064,58.746 131.064,50.673 140.323,41.414 141.974,41.414 J17.1@141.986,41.402
  Bottom Layer w0.254: 113.538,57.531 113.665,57.658 ; J13.1@123.19,29.083 123.317,28.956 J13.1@123.317,28.953 ; J18.2@141.383,15.018 141.351,14.986 141.859,14.478 J18.2@141.986,14.478 141.673,14.165 141.673,13.276
  Bottom Layer w1: C16.1@8.067,26.67 C17.1@8.067,28.956 C14.2@8.067,31.242 C15.2@8.067,33.528 ; R63.1@55.834,8.89 R65.1@55.834,11.049 R67.1@55.834,13.208
  Bottom Layer w1.5: v5(117.094,31.623) 119.634,29.083 J13.1@123.19,29.083
  Bottom Layer w2: v5(117.094,31.623) 118.618,31.623 126.584,39.589 127,40.005 ; v4(136.398,9.525) 137.922,9.525 141.673,13.276
  Bottom Layer w3: K1.NO@31.75,83.947 31.75,82.021 33.507,80.264 49.403,80.264 ; K3.NO@48.322,83.947 48.322,81.345 49.403,80.264 ; K9.NO@97.694,83.978 K9.NO@97.155,83.439 ; K14.COM@127.508,90.225 127.508,86.803 K10.NO@130.46,83.851 ; K14.COM@127.508,91.008 127.508,96.033 125.751,97.79 83.693,97.79 77.693,91.79 K8.COM@77.693,90.329 79.122,88.9 86.741,88.9 92.202,83.439 K9.NO@97.155,83.439 ; 49.403,80.264 93.98,80.264 K9.NO@97.155,83.439
  Bottom Layer w4: 113.665,57.658 126.746,57.658 ; 126.584,39.589 126.584,57.658 ; 127.254,56.388 134.493,63.627 K16.COM@135.945,63.627 ; J18.2@141.986,14.478 145.944,14.478 147.701,16.235 147.701,38.735 145.034,41.402 J17.1@141.986,41.402
  other v2: 115.287,57.941
heaterRelayPin_pcf: R54.1 U19.9 | length 58.9
  Top Layer w0.5: v3(92.202,29.21) 93.726,29.21 95.504,30.988 R54.1@95.504,33.355
  Bottom Layer w0.5: U19.9@44.831,21.539 44.831,24.892 49.149,29.21 v3(92.202,29.21)
I2C_SCL_PIN: JP2.3 R52.1 U17.14 U19.14 | length 82.8
  Top Layer w0.254: U17.14@14.097,8.657 35.39,8.657 35.958,8.089 35.958,1.91 37.106,0.762 41.761,0.762 45.847,4.848 45.847,21.463 46.355,21.971 v2(46.355,24.257)
  Bottom Layer w0.254: JP2.3@2.413,14.113 5.064,14.113 10.52,8.657 13.695,8.657 13.97,8.382 14.097,8.509 U17.14@14.097,8.657
  Bottom Layer w0.5: v2(46.355,24.257) 46.563,24.257 47.406,25.1 50.883,25.1 51.133,24.85 51.133,23.85 51.138,23.845 51.138,22.651 51.152,22.637 51.152,21.569 U19.14@51.181,21.539
I2C_SDA_PIN: JP2.2 R53.1 U17.11 U19.15 | length 82.2
  Top Layer w0.254: U17.11@14.097,16.277 20.172,16.277 26.289,10.16 35.814,10.16 37.465,8.509 37.465,5.351 38.248,4.568 42.922,4.568 43.307,4.953 43.307,24.765 45.466,26.924 50.546,26.924 v2(52.578,24.892)
  Bottom Layer w0.254: JP2.2@2.413,16.113 2.495,16.195 14.015,16.195 U17.11@14.097,16.277
  Bottom Layer w0.5: U19.15@52.451,21.539 52.48,21.569 52.48,24.817 R53.1@52.451,24.846 ; v2(52.578,24.892) 52.705,25.019 R53.1@52.705,25.1
LED_PIN: R55.1 U17.4 | length 137.9
  Top Layer w0.5: v1(23.876,41.783) 23.876,53.721 v1(27.432,57.277) ; v1(52.07,61.976) 52.07,55.626 51.181,54.737 51.181,42.823 52.602,41.402 100.562,41.402 100.711,41.253 100.711,35.814 101.646,34.879 R55.1@104.775,34.879
  Bottom Layer w0.5: U17.4@14.097,34.057 14.245,33.909 18.796,33.909 23.876,38.989 v1(23.876,41.783) ; v1(27.432,57.277) 32.183,62.028 50.607,62.028 50.659,61.976 v1(52.07,61.976)
leftButtonPin1: JP1.12 R34.1 U17.19 | length 71
  Top Layer w0.254: JP1.12@4.064,58.227 6.444,55.847 6.444,54.683 v1(6.497,54.63) ; v1@6.467,54.66 9.438,51.689 16.764,51.689 17.272,51.181 17.272,26.162 29.337,14.097 38.475,14.097 38.501,14.071 38.815,14.071 39.149,13.737 U17.19@39.497,13.737
  Bottom Layer w0.254: v1(6.497,54.63) 7.881,54.63 R34.1@8.155,54.356
leftButtonPin2: JP1.10 R36.1 U17.20 | length 87.6
  Top Layer w0.254: JP1.10@4.064,53.227 2.413,54.878 2.413,61.595 3.175,62.357 6.4,62.357 6.548,62.208 6.548,57.46 11.049,52.959 17.283,52.959 18.161,52.081 18.161,28.321 30.205,16.277 U17.20@39.497,16.277
  Bottom Layer w0.254: JP1.10@4.064,53.227 4.431,53.227 4.572,53.086 4.553,53.067 4.553,52.738 6.618,50.673 R36.1@8.155,50.673
leftButtonPin3: JP1.8 R38.1 U17.3 | length 23.1
  Top Layer w0.254: JP1.8@3.81,48.481 3.81,48.26 3.843,48.227 JP1.8@4.064,48.227 4.144,48.227 4.144,48.147 5.975,46.316 5.975,41.523 10.567,36.931 13.763,36.931 U17.3@14.097,36.597
  Bottom Layer w0.254: JP1.8@3.937,48.006 4.064,48.133 JP1.8@4.064,48.227 4.224,48.227 4.318,48.133 4.318,47.973 5.174,47.117 R38.1@8.162,47.117